# Altium PCB PCB1.PcbDoc
Units mil, origin at the board's own origin, x right, y up, seen from the top; angles counter-clockwise.
Board outline 2920 x 3687.01 mil, 2 copper layers (Top Layer, Bottom Layer); 98 components, 58 nets, 246 pads, 94 vias.
Unrouted connection lines stored in the file: 1.
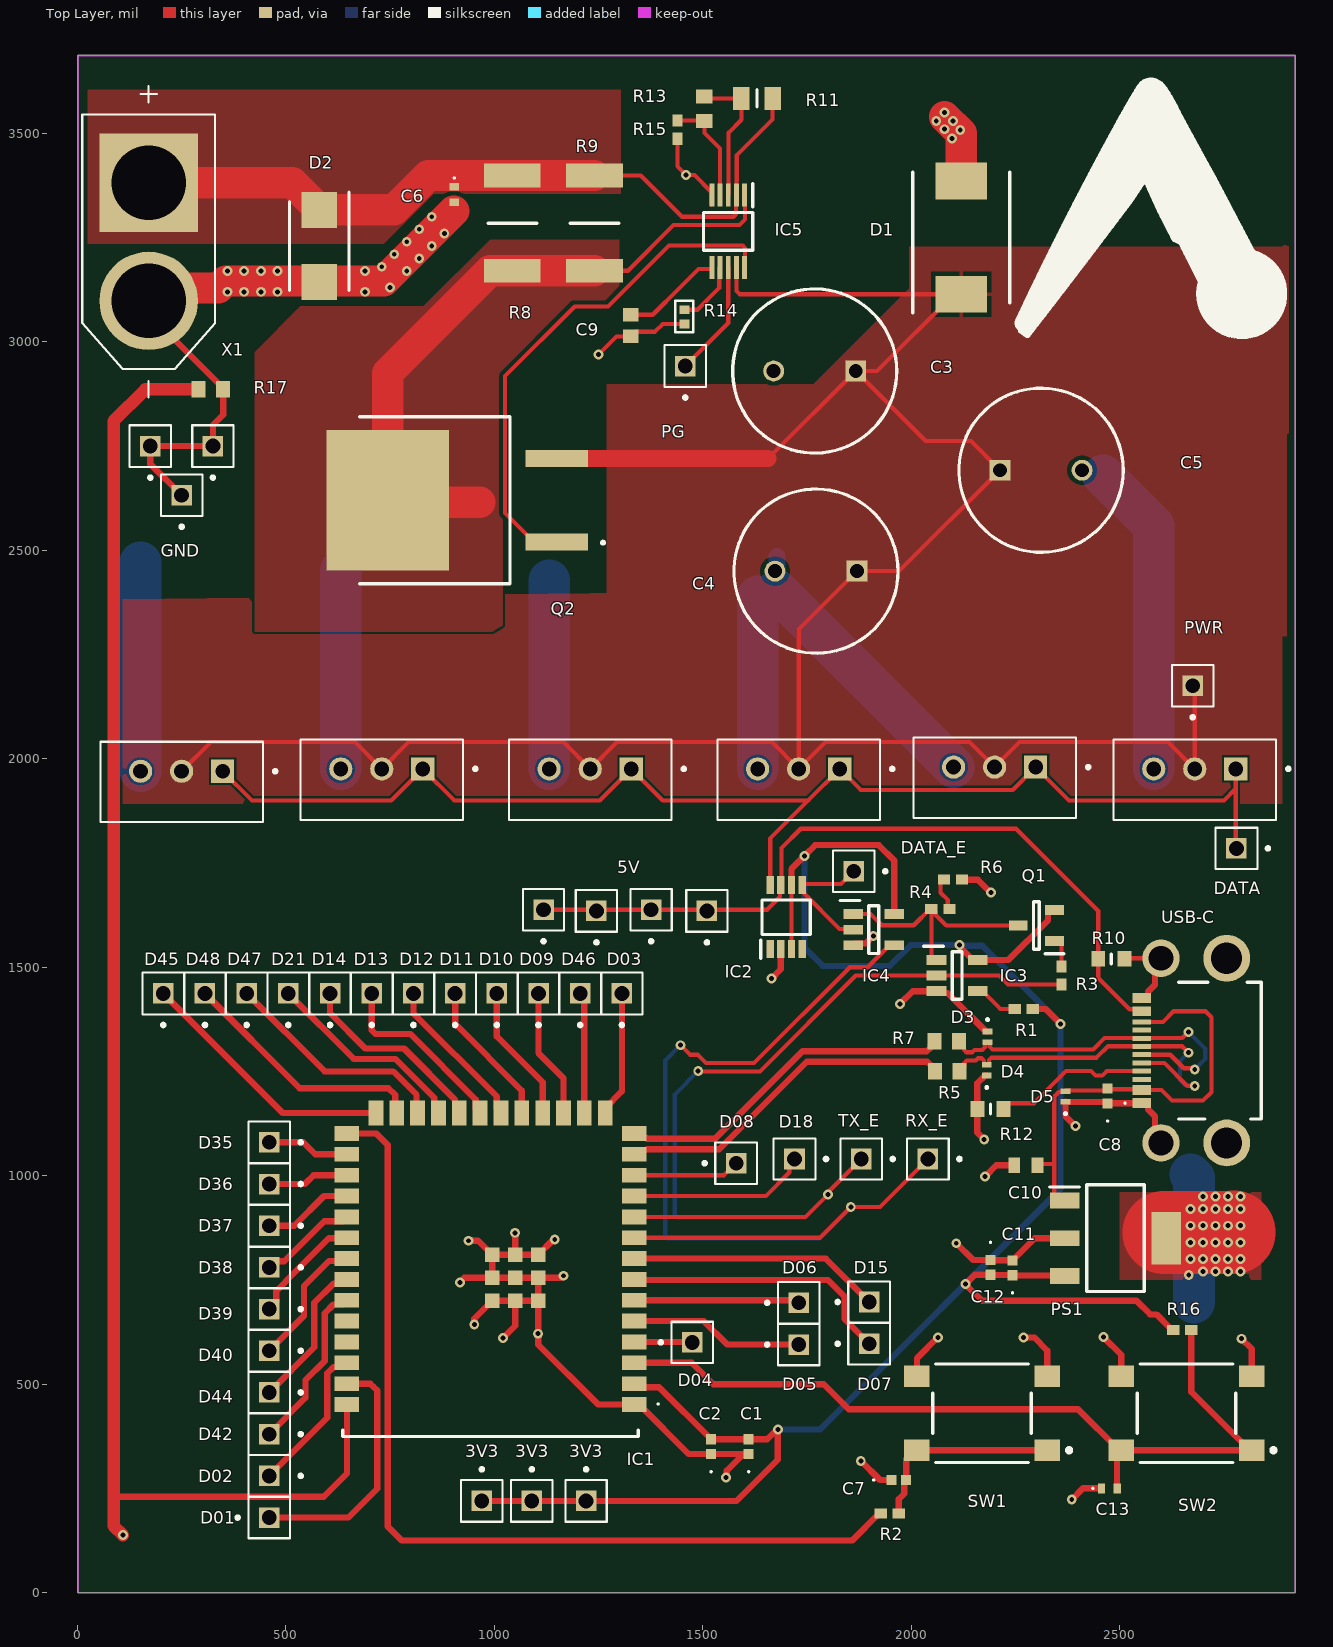
[diagram p0: Top Layer view]
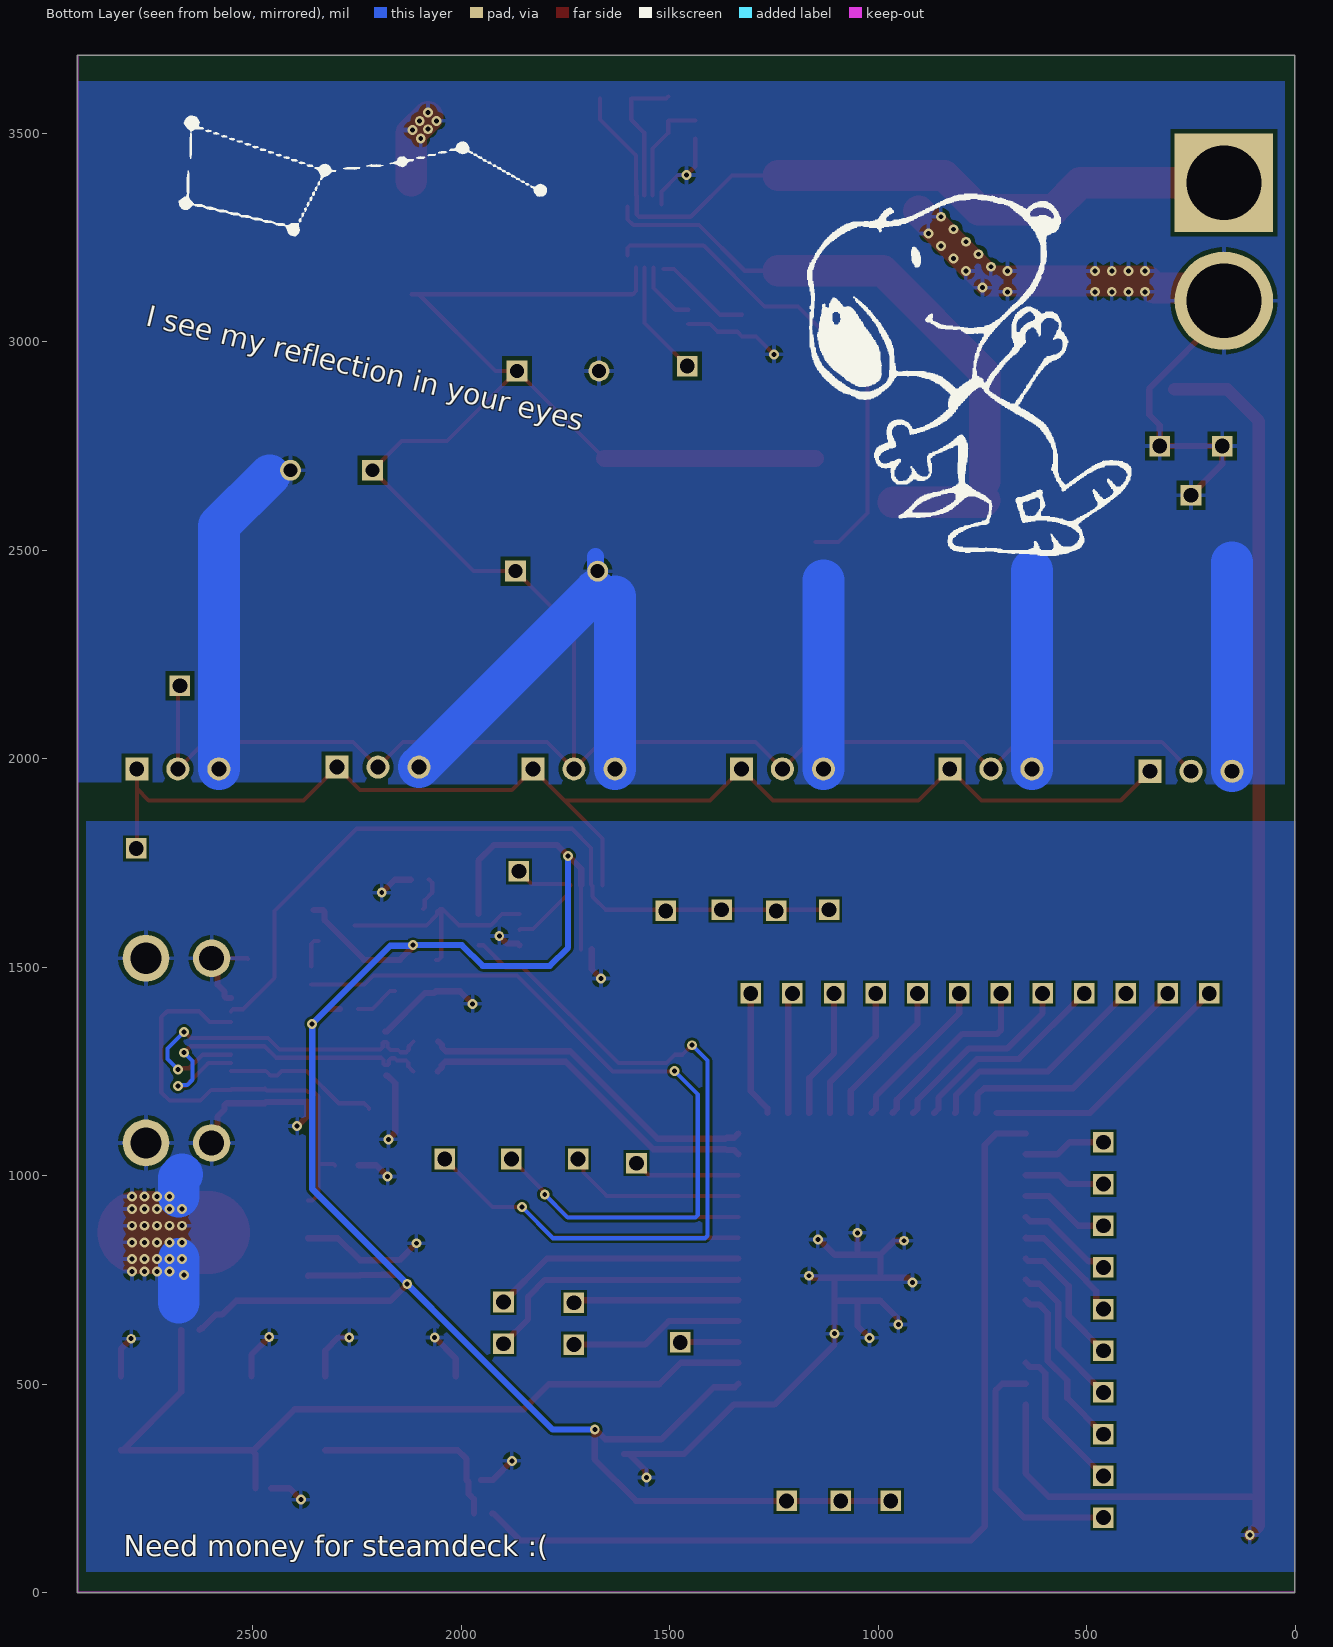
[diagram p1: Bottom Layer view, seen from below]
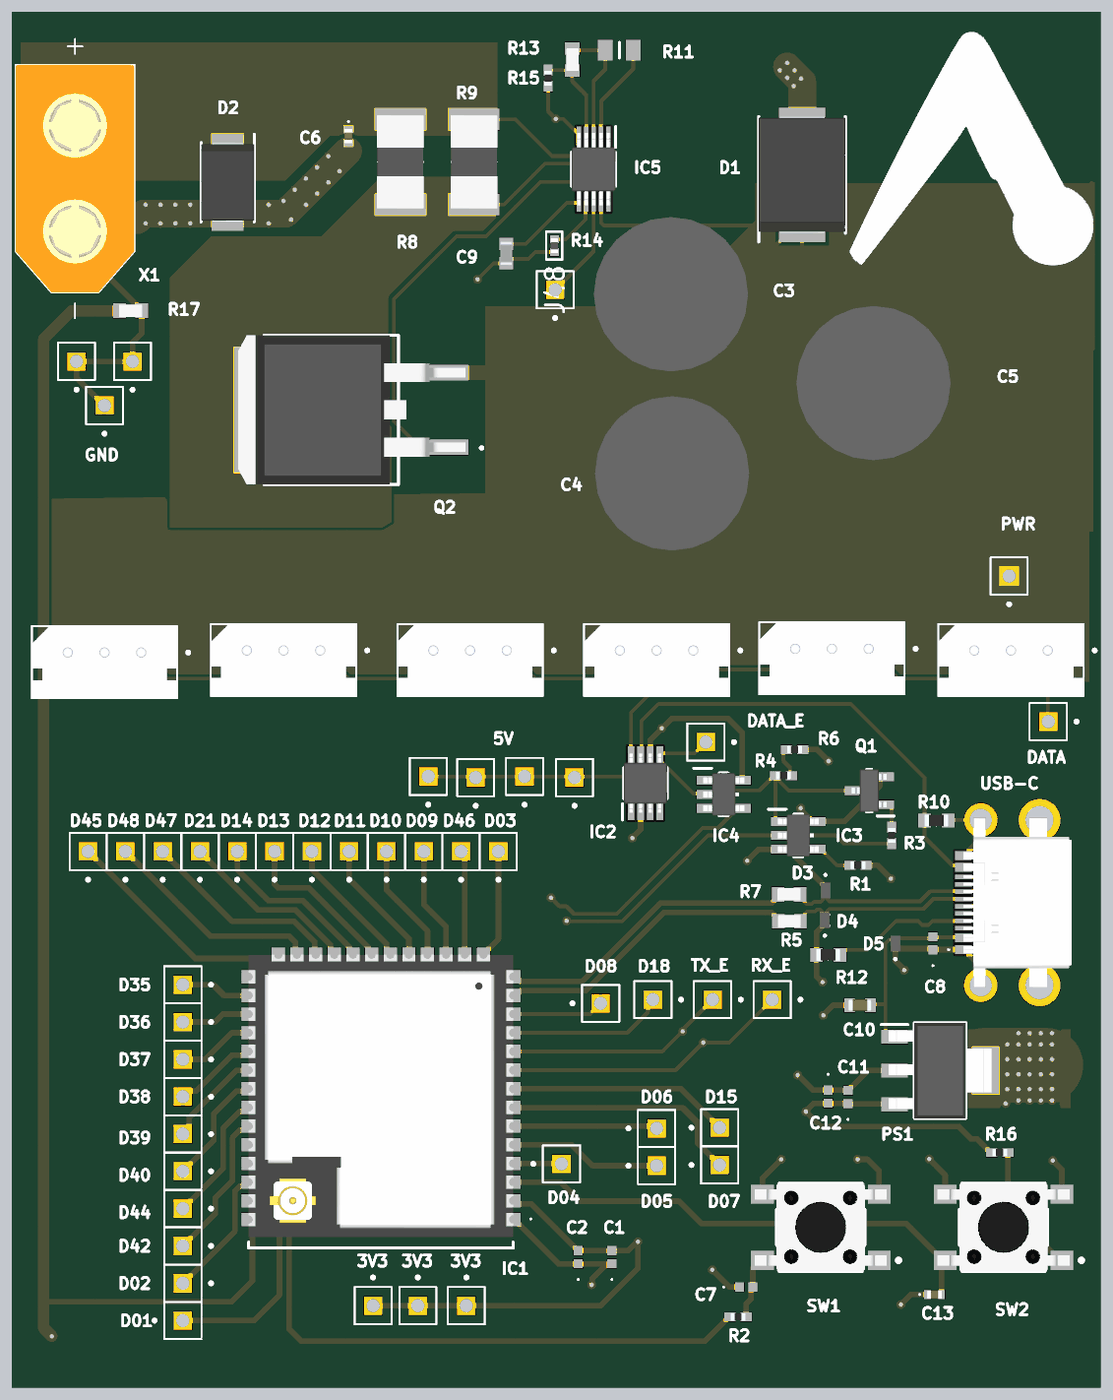
[diagram p2: 3D render of the assembled board from above, using the file's embedded part models]

## Layer stack, top to bottom
Top Solder: solder mask 0.4, Solder Resist, Dk 3.5
Top Layer: signal copper 1.378
Dielectric 1: dielectric 12.6, FR-4, Dk 4.8
Bottom Layer: signal copper 1.378
Bottom Solder: solder mask 0.4, Solder Resist, Dk 3.5

## Board outline
1,0 1,3687.01 2921,3687.01 2921,0

## Design rules (kind name [scope] priority, off if disabled: settings)
Clearance [All] p1: gap=6 ignorepadtopadclearanceinfootprint=FALSE
DiffPairsRouting [All] p1: maxlimit=10 minlimit=10 mostfreqgap=10 toplayer_minwidth=10 toplayer_maxwidth=15 toplayer_prefwidth=15 bottomlayer_minwidth=10 bottomlayer_maxwidth=15 bottomlayer_prefwidth=15 maxuncoupledlength=500
FabricationTestpoint [All] p1: side=3 testpointundercomponent=TRUE minsize=100 maxsize=100 preferedsize=60 minholesize=0 maxholesize=40 preferedholesize=32 testpointgrid=1 allowsidetop=TRUE allowsidebottom=TRUE usegrid=TRUE gridoriginx=0 gridoriginy=-1250 gridtolerance=0.01
MinimumSolderMaskSliver [All] p1: minsoldermaskwidth=4
PolygonConnect PolygonConnect_PWR [InNet('ST_PWR')] p1: thpad.connectstyle=Direct thpad.reliefconductorwidth=10 thpad.reliefentries=4 thpad.polygonreliefangle="90 Angle" thpad.airgapwidth=10 smdpad.connectstyle=Relief smdpad.reliefconductorwidth=10 smdpad.reliefentries=4 smdpad.polygonreliefangle="90 Angle" smdpad.airgapwidth=10 via.connectstyle=Direct via.reliefconductorwidth=10 via.reliefentries=4 via.polygonreliefangle="90 Angle" via.airgapwidth=10
PolygonConnect PolygonConnect_XT60 [InNet('NetC6_1')] p2: connectstyle=Direct reliefconductorwidth=10 reliefentries=4 polygonreliefangle="90 Angle" airgapwidth=10
PolygonConnect PolygonConnect_FET [InNet('NetIC5_1')] p3: connectstyle=Direct reliefconductorwidth=10 reliefentries=4 polygonreliefangle="90 Angle" airgapwidth=10
PolygonConnect ESPGND [InNet('NetIC5_1')] p4: connectstyle=Direct reliefconductorwidth=10 reliefentries=4 polygonreliefangle="90 Angle" airgapwidth=10
PolygonConnect [All] p5: connectstyle=Relief reliefconductorwidth=10 reliefentries=4 polygonreliefangle="90 Angle" airgapwidth=10
RoutingVias [All] p1: holewidth=28 width=50 viastyle="Through Hole" minholewidth=28 minwidth=50 maxholewidth=28 maxwidth=50
SilkToSolderMaskClearance [IsPad] p1: minsilkscreentomaskgap=6 clearancetoexposedcopper=TRUE
SolderMaskExpansion [All] p1: expansion=2 istentingtop=FALSE
SupplyNets "Schematic Supply Nets_3" [InNet('GND_ESP')] p1: voltage=0.000
SupplyNets "Schematic Supply Nets_2" [InNet('+5V')] p2: voltage=0.000
SupplyNets "Schematic Supply Nets_1" [InNet('+3v3')] p3: voltage=0.000
SupplyNets "Schematic Supply Nets" [InNet('GND')] p4: voltage=0.000
Width [All] p1: maxlimit=800 minlimit=10 preferedwidth=10
26 further rules are at their usual default settings.

## Classes and differential pairs
component class Schm: C1 C2 C3 C4 C5 C6 C7 C8 C9 C10 C11 C12 C13 D1 D2 D3 D4 D5 IC1 IC2 IC3 IC4 IC5 PS1 Q1 Q2 R1 R2 R3 R4 R5 R6 R7 R8 R9 R10 R11 R12 R13 R14 R15 R16 R17 SW1 SW2 X1
differential pair CON2_USB_R: +CON2_USB_R_P -CON2_USB_R_N
differential pair CON2_USB: +CON2_USB_P -CON2_USB_N

## Components (designator, comment, footprint, x,y, rotation, side; value= is the part's Value field where it differs from the comment)
3V3 "1pin connector" "1 pin_conn" 970,220 r270 top (schematic designator J19)
3V3 "1pin connector" "1 pin_conn" 1090,220 r270 top (schematic designator J18)
3V3 "1pin connector" "1 pin_conn" 1220,220 r270 top (schematic designator J16)
5V "1pin connector" "1 pin_conn" 1118,1638 r90 top (schematic designator J14)
C1 "100nF, 50V" C0402C104J4RACTU 1610,350 r90 top
C2 "10uF, 10V" C0402C104J4RACTU 1520,350 r90 top
C3 "EEU-FR1E122LB" CAPPRD500W65D1000H2700 1866.85,2930 r180 top
C4 "EEU-FR1E122LB" CAPPRD500W65D1000H2700 1870,2450 r180 top
C5 "EEU-FR1E122LB" CAPPRD500W65D1000H2700 2213,2692 r0 top
C6 "1uF, 35V" GRM15x 904,3353.7 r270 top
C7 "100nF, 50V" C0402C104J4RACTU 1970,270 r0 top
C8 "100nF, 50V" C0402C104J4RACTU 2471,1191 r90 top
C9 "150nF" CAPC1608X90N#1 1327,3039 r270 top
C10 "4u7, 16v" CAPC1608X90N#2 2275,1025 r0 top
C11 "10uF, 10V" C0402C104J4RACTU 2243,779 r90 top
C12 "10uF, 10V" C0402C104J4RACTU 2190,780 r270 top
C13 "1uF, 35V" GRM15x 2475,250 r0 top
D1 "MBRS3100T3G" DIOM8059X261N 2120,3250 r90 top
D01 "1pin connector" "1 pin_conn" 460,180 r0 top (schematic designator J2)
D02 "1pin connector" "1 pin_conn" 460,280 r180 top (schematic designator J3)
D2 "SMBJ15A" DIOM5436X244N 580,3230 r270 top
D03 "1pin connector" "1 pin_conn" 1306,1437 r90 top (schematic designator J4)
D3 "AQ3045-01ETG" AQ304501ETG 2183,1333 r270 top
D04 "1pin connector" "1 pin_conn" 1475,600 r0 top (schematic designator J5)
D4 "AQ3045-01ETG" AQ304501ETG 2181,1253 r90 top
D05 "1pin connector" "1 pin_conn" 1730,595 r0 top (schematic designator J6)
D5 "AQ3045-01ETG" AQ304501ETG 2370,1190 r90 top
D06 "1pin connector" "1 pin_conn" 1730,695 r0 top (schematic designator J7)
D07 "1pin connector" "1 pin_conn" 1899,597 r0 top (schematic designator J8)
D08 "1pin connector" "1 pin_conn" 1580,1030 r0 top (schematic designator J9)
D09 "1pin connector" "1 pin_conn" 1106,1437 r90 top (schematic designator J10)
D10 "1pin connector" "1 pin_conn" 1006,1437 r90 top (schematic designator J11)
D11 "1pin connector" "1 pin_conn" 906,1437 r90 top (schematic designator J12)
D12 "1pin connector" "1 pin_conn" 806,1437 r90 top (schematic designator J13)
D13 "1pin connector" "1 pin_conn" 706,1437 r90 top (schematic designator J21)
D14 "1pin connector" "1 pin_conn" 606,1437 r90 top (schematic designator J22)
D15 "1pin connector" "1 pin_conn" 1899,697 r0 top (schematic designator J23)
D18 "1pin connector" "1 pin_conn" 1720,1040 r180 top (schematic designator J24)
D21 "1pin connector" "1 pin_conn" 506,1437 r90 top (schematic designator J25)
D35 "1pin connector" "1 pin_conn" 460,1080 r180 top (schematic designator J26)
D36 "1pin connector" "1 pin_conn" 460,980 r180 top (schematic designator J27)
D37 "1pin connector" "1 pin_conn" 460,880 r180 top (schematic designator J28)
D38 "1pin connector" "1 pin_conn" 460,780 r180 top (schematic designator J29)
D39 "1pin connector" "1 pin_conn" 460,680 r180 top (schematic designator J30)
D40 "1pin connector" "1 pin_conn" 460,580 r180 top (schematic designator J31)
D42 "1pin connector" "1 pin_conn" 460,380 r180 top (schematic designator J33)
D44 "1pin connector" "1 pin_conn" 460,480 r180 top (schematic designator J32)
D45 "1pin connector" "1 pin_conn" 206,1437 r90 top (schematic designator J34)
D46 "1pin connector" "1 pin_conn" 1206,1437 r90 top (schematic designator J35)
D47 "1pin connector" "1 pin_conn" 406,1437 r90 top (schematic designator J36)
D48 "1pin connector" "1 pin_conn" 306,1437 r90 top (schematic designator J37)
DATA "1pin connector" "1 pin_conn" 2780,1785 r180 top (schematic designator J51)
DATA_E "1pin connector" "1 pin_conn" 1862,1730 r180 top (schematic designator J50)
GND "1pin connector" "1 pin_conn" 250,2632 r90 top (schematic designator J39)
IC1 "ESP32-S3-WROOM-1U-N8R8" ESP32S3WROOM1UN8R8 990.94,782.28 r180 top
IC2 "TXS0102VDCTR" SOP65P400X130-8N 1700,1620 r90 top
IC3 "SN74LVC1G126DBVR" SOT95P280X145-5N 2110,1480 r0 top
IC4 "SN74LVC1G125DBVR" SOT95P280X145-5N 1910,1590 r0 top
IC5 "LM5069MM-2_NOPB" LM5069MM-2/NOPB 1561,3265 r270 top
J1 "1pin connector" "1 pin_conn" 1376,1638 r90 top
J15 "1pin connector" "1 pin_conn" 1245,1635 r90 top
J17 "1pin connector" "1 pin_conn" 1510,1635 r90 top
J38 "1pin connector" "1 pin_conn" 175,2750 r90 top
J40 "1pin connector" "1 pin_conn" 325,2750 r90 top
J41 "5267-03A-X" MOLEX_5267-03A-X 1730,1950 r180 top
J42 "5267-03A-X" MOLEX_5267-03A-X 2200,1954.41 r180 top
J43 "5267-03A-X" MOLEX_5267-03A-X 2680,1950 r180 top
J44 "5267-03A-X" MOLEX_5267-03A-X 250,1944.41 r180 top
J45 "5267-03A-X" MOLEX_5267-03A-X 730,1950 r180 top
J46 "5267-03A-X" MOLEX_5267-03A-X 1230,1950 r180 top
PG "1pin connector" "1 pin_conn" 1458,2942 r90 top (schematic designator J48)
PS1 "TL1963A-33DCYR" TL1963A-33DCYR 2490,850 r0 top
PWR "1pin connector" "1 pin_conn" 2675,2175 r90 top (schematic designator J20)
Q1 "S8550" SOT95P240X110-3N 2300,1600 r180 top
Q2 "CSD19536KTT" CSD19536KTTT 677.56,2620 r0 top
R1 "10K" RESC1005X40N 2270,1400 r0 top
R2 "27R" RESC1005X40N 1948.35,190 r180 top
R3 "10K" RESC1005X40N 2360,1480 r90 top
R4 "10K" RESC1005X40N 2070,1640 r180 top
R5 "OR" RESC1608X50N 2086,1250 r180 top
R6 "10K" RESC1005X40N 2100,1710 r180 top
R7 "OR" RESC1608X50N 2085,1322 r180 top
R8 "WSLP25122L500FEA" RESC6432X89N 1043.4,3284.57 r90 top
R9 "WSLP25122L500FEA" RESC6432X89N 1240.25,3284.57 r90 top
R10 "5K1" RESC1608X60N 2480,1520 r180 top
R11 "43.2K" RESC2012X60N 1630,3584 r0 top
R12 "5K1" RESC1608X60N 2190,1160 r180 top
R13 "CRCW06035K49FKEA" RESC1608X50N 1504,3559 r90 top
R14 "8.2K" RESC1005X37N 1456,3060 r90 top value=10kΩ
R15 "RMCF0402FT9K76" RESC1005X40N 1439,3509 r90 top
R16 "10K" RESC1005X40N 2650,630 r180 top
R17 "OR" RESC1608X50N 320,2886 r0 top
RX_E "1pin connector" "1 pin_conn" 2040,1040 r180 top (schematic designator J49)
SW1 "PTS645SH50SMTR92LFS" "FP-PTS645SH50SMTR92LFS-MFG - duplicate" 2170,430 r180 top
SW2 "PTS645SH50SMTR92LFS" "FP-PTS645SH50SMTR92LFS-MFG - duplicate" 2660,430 r180 top
TX_E "1pin connector" "1 pin_conn" 1880,1040 r180 top (schematic designator J52)
USB-C "UJ20-C-H-G-MSMT-4B-P16-TR" UJ20CHGMSMT4BP16TR 2696,1300 r90 top (schematic designator J47)
X1 "XT60" AMASS_XT60-M 171,3240 r270 top

## Footprints (in the part's own frame and the unit in brackets; to place one, negate y for a bottom-side part, rotate by r counter-clockwise, add the part's x,y. Pads: shape width x height; smd on the part's side, far side on the other; paste and mask are expansions set on the pad)
"1 pin_conn" [mm]
  rect 1.25x1.25 hole 0.9: 1(0,0)
  silkscreen extent -2.02,-1.26 1.27,1.26
AMASS_XT60-M [mm]
  round 6 hole 4.55: N(3.6,0)
  rect 6x6 / inner round 6 / far side rect 6x6 hole 4.55: P(-3.6,0)
  silkscreen extent -9.5,-4.05 9.5,4.05, body extent -7.75,-4.05 7.75,4.05, height 16
AQ304501ETG [mm]
  rect 0.35x0.6 smd: 1(-0.325,0) 2(0.325,0)
  silkscreen extent -1.1,-0.05 -1,0.05, body extent -0.54,-0.34 0.54,0.34, height 0.43
C0402C104J4RACTU [mm]
  rect 0.62x0.62 smd: 1(-0.45,0) 2(0.45,0)
  silkscreen extent -1.57,-0.05 -1.47,0.05, body extent -0.52,-0.28 -0.52,-0.28
CAPC1608X90N#1 [mm]
  rect 0.83x0.94 smd: 1(-0.66,0) 2(0.66,0)
  body extent -0.81,-0.4 0.79,0.4, height 0.78
CAPC1608X90N#2 [mm]
  rect 0.73x0.94 smd: 1(-0.71,0) 2(0.71,0)
  body extent -0.8,-0.4 0.8,0.4, height 0.9
CAPPRD500W65D1000H2700 [mm]
  rect 1.275x1.275 hole 0.85: 1(0,0)
  round 1.275 hole 0.85: 2(5,0)
  silkscreen extent -2.5,-5 7.5,5, body extent -2.75,-5.25 7.75,5.25, height 27
CSD19536KTTT [mm]
  rect 3.82x1.05 smd: 1(12,-2.54) 3(12,2.54)
  rect 7.48x8.55 smd: 2(1.7,0)
  silkscreen extent 0,-5.08 14.9,5.08, body extent -1.78,-5.07 13.72,5.07, height 4.7
DIOM5436X244N [mm]
  rect 2.2x2.15 smd: 1(-2.2,0) 2(2.2,0)
  silkscreen extent -3.27,-1.81 2.7,1.81, body extent -2.7,-1.81 2.7,1.81, height 2.44
DIOM8059X261N [mm]
  rect 2.25x3.15 smd: 1(-3.45,0) 2(3.45,0)
  silkscreen extent -4.57,-2.95 3.98,2.95, body extent -3.98,-2.95 3.98,2.95, height 2.61
ESP32S3WROOM1UN8R8 [mm]
  rect 1.5x0.9 smd: 1(-8.75,8.41) 2(-8.75,7.14) 3(-8.75,5.87) 4(-8.75,4.6) 5(-8.75,3.33) 6(-8.75,2.06) 7(-8.75,0.79) 8(-8.75,-0.48) 9(-8.75,-1.75) 10(-8.75,-3.02) 11(-8.75,-4.29) 12(-8.75,-5.56) 13(-8.75,-6.83) 14(-8.75,-8.1) 27(8.75,-8.1) 28(8.75,-6.83) 29(8.75,-5.56) 30(8.75,-4.29) 31(8.75,-3.02) 32(8.75,-1.75) 33(8.75,-0.48) 34(8.75,0.79) 35(8.75,2.06) 36(8.75,3.33) 37(8.75,4.6) 38(8.75,5.87) 39(8.75,7.14) 40(8.75,8.41)
  rect 0.9x1.5 smd: 15(-6.985,-9.35) 16(-5.715,-9.35) 17(-4.445,-9.35) 18(-3.175,-9.35) 19(-1.905,-9.35) 20(-0.635,-9.35) 21(0.635,-9.35) 22(1.905,-9.35) 23(3.175,-9.35) 24(4.445,-9.35) 25(5.715,-9.35) 26(6.985,-9.35)
  rect 0.9x0.9 smd: 41(-1.5,0.69) 42(-2.9,2.09) 43(-2.9,0.69) 44(-2.9,-0.71) 45(-1.5,-0.71) 46(-0.1,-0.71) 47(-0.1,0.69) 48(-0.1,2.09) 49(-1.5,2.09)
  silkscreen extent -10.26,8.33 9,10.36, body extent -9.01,-9.61 9.01,9.6, height 3.25
"FP-PTS645SH50SMTR92LFS-MFG - duplicate" [mm]
  rect 1.55x1.3 smd paste+0 mask+0: 1(-3.975,2.25) 2(3.975,2.25) 3(-3.975,-2.25) 4(3.975,-2.25)
  silkscreen extent -5.43,-3 3,3, body extent -4.5,-3 4.5,3, height 4.3
GRM15x [mm]
  rect 0.45x0.6 smd: 1(-0.475,0) 2(0.475,0)
  silkscreen extent -1.05,-0.05 -0.95,0.05, body extent -0.5,-0.28 0.5,0.27, height 0.5
LM5069MM-2/NOPB [mm]
  rect 1.4x0.3 smd mask+0.152: 1(-2.2,1) 2(-2.2,0.5) 3(-2.2,0) 4(-2.2,-0.5) 5(-2.2,-1) 6(2.2,-1) 7(2.2,-0.5) 8(2.2,0) 9(2.2,0.5) 10(2.2,1)
  silkscreen extent -2.9,-1.5 1.15,1.5, body extent -2.46,-1.5 2.46,1.5, height 1.1
MOLEX_5267-03A-X [mm]
  rect 1.408x1.408 / inner round 1.408 / far side rect 1.408x1.408 hole 0.9: 1(-2.5,-0.65)
  round 1.408 hole 0.9: 2(0,-0.65) 3(2.5,-0.65)
  silkscreen extent -5.8,-2.45 4.95,2.45, body extent -4.95,-2.45 4.95,2.45, height 5.81
RESC1005X37N [mm]
  rect 0.54x0.6 smd: 1(-0.432,0) 2(0.432,0)
  silkscreen extent -0.94,-0.53 0.97,0.56, body extent -0.5,-0.25 0.5,0.25, height 0.37
RESC1005X40N [mm]
  rect 0.75x0.6 smd: 1(-0.55,0) 2(0.55,0)
  body extent -0.5,-0.25 0.5,0.25, height 0.4
RESC1608X50N [mm]
  rect 0.85x1 smd: 1(-0.75,0) 2(0.75,0)
  body extent -0.77,-0.43 0.78,0.42, height 0.45
RESC1608X60N [mm]
  rect 0.85x0.95 smd: 1(-0.8,0) 2(0.8,0)
  silkscreen extent 0,-0.3 0,0.3, body extent -0.8,-0.4 0.8,0.4, height 0.6
RESC2012X60N [mm]
  rect 1x1.4 smd: 1(-0.95,0) 2(0.95,0)
  silkscreen extent 0,-0.53 0,0.53, body extent 0,0 0,0
RESC6432X89N [mm]
  rect 1.45x3.45 smd: 1(-2.9,0) 2(2.9,0)
  silkscreen extent 0,-1.49 0,1.49, body extent -3.17,-1.59 3.17,1.59, height 0.64
SOP65P400X130-8N [mm]
  rect 1.1x0.45 smd mask+0.152: 1(-1.95,0.975) 2(-1.95,0.325) 3(-1.95,-0.325) 4(-1.95,-0.975) 5(1.95,-0.975) 6(1.95,-0.325) 7(1.95,0.325) 8(1.95,0.975)
  silkscreen extent -2.5,-1.48 1.05,1.55, body extent -2.01,-1.48 2.01,1.48, height 0.91
SOT95P240X110-3N [mm]
  rect 1.15x0.6 smd: 1(-1.1,0.95) 2(-1.1,-0.95) 3(1.1,0)
  silkscreen extent -1.68,-1.45 0.18,1.73, body extent -1.2,-1.45 1.2,1.45, height 1.1
SOT95P280X145-5N [mm]
  rect 1.2x0.6 smd: 1(-1.25,0.95) 2(-1.25,0) 3(-1.25,-0.95) 4(1.25,-0.95) 5(1.25,0.95)
  silkscreen extent -2.03,-1.45 0.3,1.78, body extent -1.4,-1.45 1.4,1.45, height 1.2
TL1963A-33DCYR [mm]
  rect 1.8x0.95 smd: 1(-3.1,2.3) 2(-3.1,0) 3(-3.1,-2.3)
  rect 1.8x3.2 smd: 4(3.1,0)
  silkscreen extent -4,-3.25 1.75,3.25, body extent -3.5,-3.25 3.5,3.25, height 1.68
UJ20CHGMSMT4BP16TR [mm]
  rect 0.6x1.15 smd mask+0.152: A1(-3.2,3.638) A4(-2.4,3.638) B1(3.2,3.638) B4(2.4,3.638)
  rect 0.3x1.15 smd mask+0.152: A5(-1.25,3.638) A6(-0.25,3.638) A7(0.25,3.638) A8(1.25,3.638) B5(1.75,3.638) B6(0.75,3.638) B7(-0.75,3.638) B8(-1.75,3.638)
  round 2.28 hole 1.52: MH1(-5.625,2.463) MH2(5.625,2.463)
  round 2.85 hole 1.9: MH3(-5.625,-1.537) MH4(5.625,-1.537)
  silkscreen extent -4.17,-3.64 4.17,4.7, body extent -5.78,-3.55 5.77,3.66, height 2.25

## Part data
3V3 3V3 3V3 5V D01 D02 D03 D04 D05 D06 D07 D08 D09 D10 D11 D12 D13 D14 D15 D18 D21 D35 D36 D37 D38 D39 D40 D42 D44 D45 D46 D47 D48 DATA DATA_E GND J1 J15 J17 J38 J40 PG PWR RX_E TX_E: "Board Connector, 1 Contact(s), 1 Row(s), Female, Straight, Solder Terminal, Black Insulator, Receptacle"
C1 C7 C8: library part E0402X7R104K500NTB, "100 nF 10% 50V Ceramic Capacitor X7R 0402 (1005 Metric)", Manufacturer_Name="Yageo Group", Manufacturer_Part_Number=C0402C101G3GALTU, Datasheet Link=https://content.kemet.com/datasheets/KEM_C1002_X7R_SMD.pdf, Height=0.55mm
C2 C11 C12: library part CL21A106KPFNNNF, "Cap Ceramic 10uF 10V X5R 10% SMD 0805 85C Embossed T/R", Manufacturer_Name="Yageo Group", Manufacturer_Part_Number=C0402C101G3GALTU, Datasheet Link=https://content.kemet.com/datasheets/KEM_C1002_X7R_SMD.pdf, Height=0.55mm
C3 C4 C5: "Capacitor Polarised", Manufacturer_Name=Panasonic, Mouser Part Number=667-EEU-FR1E122LB, Datasheet Link=http://industrial.panasonic.com/cdbs/www-data/pdf/RDF0000/ABA0000C1259.pdf, Height=27mm, Manufacturer_Part_Number=EEU-FR1E122LB, Mouser Price/Stock=https://www.mouser.com/Search/Refine.aspx?Keyword=667-EEU-FR1E122LB
C6 C13: library part GRM155R6YA105ME11D, "Capacitor", Manufacturer_Name="Murata Electronics", Mouser Part Number=81-GRM155R6YA105ME1D, Arrow Part Number=GRM155R6YA105ME11D, Arrow Price/Stock=https://www.arrow.com/en/products/grm155r6ya105me11d/murata-manufacturing, Datasheet Link=https://search.murata.co.jp/Ceramy/image/img/A01X/G101/ENG/GRM155R6YA105ME11-01A.pdf, Height=0.33mm, Manufacturer_Part_Number=GRM155R6YA105ME11D, Mouser Price/Stock=https://www.mouser.com/Search/Refine.aspx?Keyword=81-GRM155R6YA105ME1D
C9: library part 06033D224MAT2A, "Multilayer Ceramic Capacitors MLCC - SMD/SMT KGM15BR51E224MT NEW GLOBAL PN 25V .22uF A 581-", Manufacturer_Name="Kyocera AVX", Mouser Part Number=581-06033D224MAT2A, Datasheet Link=https://componentsearchengine.com/Datasheets/1/06031A100FAT2A.pdf, Height=0.9mm, Manufacturer_Part_Number=06033D224MAT2A, Mouser Price/Stock=https://www.mouser.co.uk/ProductDetail/KYOCERA-AVX/06033D224MAT2A?qs=VsusWq3clnxkz0k6zqAqqQ%3D%3D
C10: library part grm188z71c475ke21d, "Capacitor", Arrow Part Number=CL10A475KO8NNNC, Manufacturer_Name=SAMSUNG, Mouser Part Number=187-CL10A475KO8NNNC, Arrow Price/Stock=https://www.arrow.com/en/products/cl10a475ko8nnnc/samsung-electro-mechanics.html?utm_currency=USD&region=nac, Datasheet Link=https://rs.componentsearchengine.com/Datasheets/2/CL10A475KO8NNNC.pdf, Height=0.9mm, Manufacturer_Part_Number=CL10A475KO8NNNC, Mouser Price/Stock=https://www.mouser.co.uk/ProductDetail/Samsung-Electro-Mechanics/CL10A475KO8NNNC?qs=X6jEic%2FHinAbIjmLnFfqqQ%3D%3D
D1: "Diode", Manufacturer_Name=onsemi, Mouser Part Number=863-MBRS3100T3G, Arrow Part Number=MBRS3100T3G, Arrow Price/Stock=https://www.arrow.com/en/products/mbrs3100t3g/on-semiconductor?utm_currency=USD&region=nac, Datasheet Link=https://www.onsemi.com/pub/Collateral/MBRS3100T3-D.PDF, Height=2.61mm, Manufacturer_Part_Number=MBRS3100T3G, Mouser Price/Stock=https://www.mouser.co.uk/ProductDetail/onsemi/MBRS3100T3G?qs=3JMERSakebrbkNtjl3tdRw%3D%3D
D2: "TVS Diode (Uni-directional)", Manufacturer_Name=Vishay, Mouser Part Number=78-SMBJ15A, Datasheet Link=http://www.vishay.com/docs/88392/smbj.pdf, Height=2.44mm, Manufacturer_Part_Number=SMBJ15A, Mouser Price/Stock=https://www.mouser.co.uk/ProductDetail/Vishay-General-Semiconductor/SMBJ15A?qs=%252BA9HMDDz5KavBY56EO7ceQ%3D%3D
D3 D4 D5: "TVS Diode (Bi-directional)", Manufacturer_Name=LITTELFUSE, Mouser Part Number=576-AQ3045-01ETG, Arrow Part Number=AQ3045-01ETG, Arrow Price/Stock=https://www.arrow.com/en/products/aq3045-01etg/littelfuse.html?utm_currency=USD&region=nac, Datasheet Link=http://m.littelfuse.com/~/media/electronics/datasheets/tvs_diode_arrays/littelfuse_tvs_diode_array_aq3045_datasheet.pdf.pdf, Height=0.42mm, Manufacturer_Part_Number=AQ3045-01ETG, Mouser Price/Stock=https://www.mouser.co.uk/ProductDetail/Littelfuse/AQ3045-01ETG?qs=lM4gFlnEeEMEfe%252B5jSw4OA%3D%3D
IC1: "Integrated Circuit", Manufacturer_Name="Espressif Systems", Mouser Part Number=356-ESP32S3WRM1UN8R8, Datasheet Link=https://www.espressif.com/sites/default/files/documentation/esp32-s3-wroom-1_wroom-1u_datasheet_en.pdf, Height=3.35mm, Manufacturer_Part_Number=ESP32-S3-WROOM-1U-N8R8, Mouser Price/Stock=https://www.mouser.co.uk/ProductDetail/Espressif-Systems/ESP32-S3-WROOM-1U-N8R8?qs=Li%252BoUPsLEnvOglIa3CypaQ%3D%3D
IC2: "Integrated Circuit", Manufacturer_Name="Texas Instruments", Mouser Part Number=595-TXS0102VDCTR, Arrow Part Number=TXS0102VDCTR, Arrow Price/Stock=https://www.arrow.com/en/products/txs0102vdctr/texas-instruments?utm_currency=USD&region=nac, Datasheet Link=https://www.ti.com/lit/ds/symlink/txs0102v.pdf?ts=1736527127556&ref_url=https%253A%252F%252Fwww.ti.com%252Flogic-voltage-translation%252Fvoltage-translators-level-shifters%252Fproducts.html, Height=1.3mm, Manufacturer_Part_Number=TXS0102VDCTR, Mouser Price/Stock=https://www.mouser.co.uk/ProductDetail/Texas-Instruments/TXS0102VDCTR?qs=olJun0bQHM%2FUS3bAIjbB0A%3D%3D
IC3: "Integrated Circuit", Manufacturer_Name="Texas Instruments", Mouser Part Number=595-SN74LVC1G126DBVR, Arrow Part Number=SN74LVC1G126DBVR, Arrow Price/Stock=https://www.arrow.com/en/products/sn74lvc1g126dbvr/texas-instruments.html?utm_currency=USD&region=nac, Datasheet Link=http://www.ti.com/lit/ds/symlink/sn74lvc1g126.pdf, Height=1.45mm, Manufacturer_Part_Number=SN74LVC1G126DBVR, Mouser Price/Stock=https://www.mouser.co.uk/ProductDetail/Texas-Instruments/SN74LVC1G126DBVR?qs=pajgIaoyDUi3T2WgNNfd3w%3D%3D
IC4: "Integrated Circuit", Manufacturer_Name="Texas Instruments", Mouser Part Number=595-SN74LVC1G125DBVR, Arrow Part Number=SN74LVC1G125DBVR, Arrow Price/Stock=https://www.arrow.com/en/products/sn74lvc1g125dbvr/texas-instruments.html?utm_currency=USD&region=asia, Datasheet Link=http://www.ti.com/lit/ds/symlink/sn74lvc1g125.pdf, Height=1.45mm, Manufacturer_Part_Number=SN74LVC1G125DBVR, Mouser Price/Stock=https://www.mouser.co.uk/ProductDetail/Texas-Instruments/SN74LVC1G125DBVR?qs=dT9u2OTAaVWCjkJK89JQQg%3D%3D
IC5: "Integrated Circuit", Arrow Part Number=LM5069MM-2/NOPB, Manufacturer_Name="Texas Instruments", Mouser Part Number=926-LM5069MM-2/NOPB, Arrow Price/Stock=https://www.arrow.com/en/products/lm5069mm-2nopb/texas-instruments.html?utm_currency=USD&region=nac, Datasheet Link=http://www.ti.com/lit/gpn/lm5069, Height=1.1mm, Manufacturer_Part_Number=LM5069MM-2/NOPB, Mouser Price/Stock=https://www.mouser.co.uk/ProductDetail/Texas-Instruments/LM5069MM-2-NOPB?qs=QbsRYf82W3EdgSJlau%252Bfzw%3D%3D
J41 J42 J43 J44 J45 J46: "CONN HEADER TH 3POS 2.5mm", Package=None, Check_prices=https://www.snapeda.com/parts/5267-03A-X/Molex/view-part/?ref=eda, MF=Molex, MP=5267-03A-X, SnapEDA_Link=https://www.snapeda.com/parts/5267-03A-X/Molex/view-part/?ref=snap
PS1: "Power Supply", Manufacturer_Name="Texas Instruments", Mouser Part Number=595-TL1963A-33DCYR, Arrow Part Number=TL1963A-33DCYR, Arrow Price/Stock=https://www.arrow.com/en/products/tl1963a-33dcyr/texas-instruments?utm_currency=USD&region=nac, Datasheet Link=http://www.ti.com/lit/gpn/tl1963a, Height=1.8mm, Manufacturer_Part_Number=TL1963A-33DCYR, Mouser Price/Stock=https://www.mouser.co.uk/ProductDetail/Texas-Instruments/TL1963A-33DCYR?qs=IK5e5L0zOXhRu%2FNTAfJNEA%3D%3D
Q1: "Transistor BJT PNP", Manufacturer_Name=Galaxy, Datasheet Link=https://datasheet.datasheetarchive.com/originals/distributors/Datasheets-3/DSA-49109.pdf, Height=1.1mm, Manufacturer_Part_Number=S8550
Q2: "MOSFET (N-Channel)", Manufacturer_Name="Texas Instruments", Mouser Part Number=595-CSD19536KTT, Arrow Part Number=CSD19536KTT, Arrow Price/Stock=https://www.arrow.com/en/products/csd19536ktt/texas-instruments.html?utm_currency=USD&region=nac, Datasheet Link=http://www.ti.com/lit/gpn/csd19536ktt, Manufacturer_Part_Number=CSD19536KTT, Mouser Price/Stock=https://www.mouser.co.uk/ProductDetail/Texas-Instruments/CSD19536KTT?qs=MiqG6Kq1qKP2NIsb3jZrDg%3D%3D
R1 R3 R4 R6 R16: library part MC00625W0402110K, "Res General Purpose Thick Film 0402 10k Ohm 1% 1/16W 100ppm/C Molded", Manufacturer_Name="Multicomp Pro", Datasheet Link=http://www.farnell.com/datasheets/2140393.pdf?_ga=1.247542791.1411154270.1472651675, Height=0.4mm, Manufacturer_Part_Number=MC00625W0402110K
R2: library part RMCF0402FT27R0, "RMCF0402FT27R0", Arrow Part Number=RC0402FR-0727RL, Manufacturer_Name="Yageo Group", Mouser Part Number=603-RC0402FR-0727RL, Arrow Price/Stock=https://www.arrow.com/en/products/rc0402fr-0727rl/yageo.html?utm_currency=USD&region=nac, Datasheet Link=https://www.yageogroup.com/content/datasheet/asset/file/PYU-RC_GROUP_51_ROHS_L, Height=0.4mm, Manufacturer_Part_Number=RC0402FR-0727RL, Mouser Price/Stock=https://www.mouser.co.uk/ProductDetail/YAGEO/RC0402FR-0727RL?qs=UOUeRUa%252B8Wlb37UyFHw9Bw%3D%3D
R5 R7 R17: library part CRCW06030000Z0EC, "Resistor", Manufacturer_Name=Vishay, Mouser Part Number=71-CRCW06030000Z0EC, Arrow Part Number=CRCW06030000Z0EC, Arrow Price/Stock=https://www.arrow.com/en/products/crcw06030000z0ec/vishay?utm_currency=USD&region=nac, Datasheet Link=http://www.vishay.com/docs/20035/dcrcwe3.pdf, Height=0.5mm, Manufacturer_Part_Number=CRCW06030000Z0EC, Mouser Price/Stock=https://www.mouser.co.uk/ProductDetail/Vishay-Dale/CRCW06030000Z0EC?qs=5Vo7YKalRVV5nT3RQodYAA%3D%3D
R8 R9: "Fixed Resistor, Metal Strip, 3W, 0.0025ohm, 0.0866V, 1% +/-Tol, 275ppm/Cel, Surface Mount, 2512", Manufacturer_Name=Vishay, Mouser Part Number=71-WSLP25122L500FEA, Arrow Part Number=WSLP25122L500FEA, Arrow Price/Stock=https://www.arrow.com/en/products/wslp25122l500fea/vishay?utm_currency=USD&region=nac, Datasheet Link=https://componentsearchengine.com/Datasheets/1/WSLP25122L500FEA.pdf, Height=0.889mm, Manufacturer_Part_Number=WSLP25122L500FEA, Mouser Price/Stock=https://www.mouser.co.uk/ProductDetail/Vishay-Dale/WSLP25122L500FEA?qs=%2FCXICPRLKg%252BpcyljWM%2FHhA%3D%3D
R10 R12: library part MCWR06X5101FTL, "Res Thick Film 0603 5.1K Ohm 1% 0.1W(1/10W) 100ppm/C Pad SMD T/R", Manufacturer_Name="Multicomp Pro", Datasheet Link=https://4donline.ihs.com/images/VipMasterIC/IC/SCMP/SCMP-S-A0009547702/SCMP-S-A0009547702-1.pdf?hkey=6D3A4C79FDBF58556ACFDE234799DDF0, Height=0.6mm, Manufacturer_Part_Number=MCWR06X5101FTL
R11: library part CR0805-FX-4322ELF, "Res Thick Film 0805 43.2K Ohm 1% 1/8W 100ppm/C Molded SMD SMD Paper Tape on Plastic Reel", Manufacturer_Name=Bourns, Mouser Part Number=652-CR0805FX-4322ELF, Datasheet Link=https://www.bourns.com/pdfs/chpreztr.pdf, Height=0.6mm, Manufacturer_Part_Number=CR0805-FX-4322ELF, Mouser Price/Stock=https://www.mouser.co.uk/ProductDetail/Bourns/CR0805-FX-4322ELF?qs=TYKCbaKwe1AoFj9Z1kLM%2Fw%3D%3D
R13: "Res Thick Film 0603 5.49K Ohm 1% 0.1W(1/10W) 100ppm/C Pad SMD T/R Automotive AEC-Q200", Manufacturer_Name=Vishay, Mouser Part Number=71-CRCW0603-5.49K-E3, Datasheet Link=http://www.vishay.com/docs/20035/dcrcwe3.pdf, Height=0.5mm, Manufacturer_Part_Number=CRCW06035K49FKEA, Mouser Price/Stock=https://www.mouser.co.uk/ProductDetail/Vishay-Dale/CRCW06035K49FKEA?qs=C0yavoHm3BmrHuoVQmHL9Q%3D%3D
R14: library part AC0402FRE0710KL, "Thin Film Resistors - SMD MCT 0603-50 1% P5 10K2", Case/Package=0402, LCSC Part Number=C7209924, Manufacturer="Yageo Group", Max Operating Temperature=155°C, Min Operating Temperature=-55°C, Power Dissipation=62.5mW, Supplier Part Number=13-AC0402FRE0710KLCT-ND, Temperature Coefficient=50ppm/°C, Tolerance=1%, Working Voltage=50V, Category="Chip SMD Resistors", China RoHS=Non-Compliant, ComponentLink1Description=https://datasheet.octopart.com:443/AC0402FRE0710KL-Yageo-datasheet-182189378.pdf?src-supplier=IHS, ComponentLink1URL=https://datasheet.octopart.com:443/AC0402FRE0710KL-Yageo-datasheet-182189378.pdf?src-supplier=IHS, ComponentLink2Description=https://datasheet.octopart.com/AC0402FRE0710KL-Yageo-datasheet-12512238.pdf, ComponentLink2URL=https://datasheet.octopart.com/AC0402FRE0710KL-Yageo-datasheet-12512238.pdf, ComponentLink3Description=http://sigma.octopart.com:80/rohs_statement/Yageo-company-2.pdf?src-supplier=Compliance+Statements, ComponentLink3URL=http://sigma.octopart.com:80/rohs_statement/Yageo-company-2.pdf?src-supplier=Compliance+Statements, ComponentLink4Description=http://sigma.octopart.com:80/conflict_mineral_statement/Yageo-company-3.pdf?src-supplier=Compliance+Statements, ComponentLink4URL=http://sigma.octopart.com:80/conflict_mineral_statement/Yageo-company-3.pdf?src-supplier=Compliance+Statements, Height=320µm, Lifecycle Status=Production, Manufacturer Part Number=AC0402FRE0710KL, Mounting Technology="Surface Mount", Number of Terminals=2, Packaging="Tape & Reel", Pricing="1=0.1, 10=0.037, 25=0.0276, 50=0.0226, 100=0.0186, 250=0.01476, 500=0.01256, 1000=0.01081, 5000=0.00806 (USD)", REACH SVHC=Yes, RoHS=Compliant, Stock=4000, Supplier=DigiKey, Width=500µm
R15: "Res Thick Film 0402 9.76K Ohm 1% 0.063W 100ppm/C Molded SMD Paper T/R", Manufacturer_Name="Stackpole Electronics", Datasheet Link=https://cs.seielect.com/catalog/SEI-RMCF_RMCP.pdf, Height=0.4mm, Manufacturer_Part_Number=RMCF0402FT9K76
SW1 SW2: "SWITCH TACTILE SPST-NO 0.05A 12V", Case/Package=SMD/SMT, Color=Black, Contact Current Rating=50mA, Contact Resistance=100mΩ, Insulation Resistance=100GΩ, LCSC Part Number=C221869, Manufacturer="C&K Components", Max Operating Temperature=60°C, Max Voltage Rating (DC)=12V, Min Operating Temperature=-20°C, Operating Force=1.96N, Supplier Part Number=CKN9085CT-ND, Actuator Material="Nylon, Polyamide", Category="Tactile Switches", ComponentLink1Description=https://datasheet.octopart.com:443/PTS645SH50SMTR92LFS-C%26K-Components-datasheet-169841344.pdf?src-supplier=Farnell, ComponentLink1URL=https://datasheet.octopart.com:443/PTS645SH50SMTR92LFS-C%26K-Components-datasheet-169841344.pdf?src-supplier=Farnell, ComponentLink2Description=https://datasheet.octopart.com:443/PTS645SH50SMTR92LFS-C%26K-Components-datasheet-165782998.pdf?src-supplier=Farnell, ComponentLink2URL=https://datasheet.octopart.com:443/PTS645SH50SMTR92LFS-C%26K-Components-datasheet-165782998.pdf?src-supplier=Farnell, ComponentLink3Description=https://datasheet.octopart.com:443/PTS645SH50SMTR92LFS-C%26K-Components-datasheet-67873720.pdf?src-supplier=Upverter, ComponentLink3URL=https://datasheet.octopart.com:443/PTS645SH50SMTR92LFS-C%26K-Components-datasheet-67873720.pdf?src-supplier=Upverter, ComponentLink4Description=https://datasheet.octopart.com:443/PTS645SH50SMTR92-LFS-C%26K-Components-datasheet-141421486.pdf?src-supplier=Upverter, ComponentLink4URL=https://datasheet.octopart.com:443/PTS645SH50SMTR92-LFS-C%26K-Components-datasheet-141421486.pdf?src-supplier=Upverter, ComponentLink5Description=https://datasheet.octopart.com:443/PTS645SH50SMTR92-LFS-C%26K-Components-datasheet-110647872.pdf?src-supplier=TME, ComponentLink5URL=https://datasheet.octopart.com:443/PTS645SH50SMTR92-LFS-C%26K-Components-datasheet-110647872.pdf?src-supplier=TME, ComponentLink6Description=https://datasheet.octopart.com:443/PTS645SH50SMTR-92-LFS-C%26K-Components-datasheet-150821959.pdf?src-supplier=TME, ComponentLink6URL=https://datasheet.octopart.com:443/PTS645SH50SMTR-92-LFS-C%26K-Components-datasheet-150821959.pdf?src-supplier=TME, ComponentLink7Description=https://datasheet.octopart.com:443/PTS645SH50SMTR92LFS-C%26K-Components-datasheet-138128951.pdf?src-supplier=Future+Electronics, ComponentLink7URL=https://datasheet.octopart.com:443/PTS645SH50SMTR92LFS-C%26K-Components-datasheet-138128951.pdf?src-supplier=Future+Electronics, ComponentLink8Description=https://datasheet.octopart.com:443/PTS645SH50SMTR92LFS-C%26K-Components-datasheet-62111174.pdf?src-supplier=Future+Electronics, ComponentLink8URL=https://datasheet.octopart.com:443/PTS645SH50SMTR92LFS-C%26K-Components-datasheet-62111174.pdf?src-supplier=Future+Electronics, ComponentLink9Description=https://datasheet.octopart.com:443/PTS645SH50SMTR92LFS-C%26K-Components-datasheet-24578962.pdf?src-supplier=Future+Electronics, ComponentLink9URL=https://datasheet.octopart.com:443/PTS645SH50SMTR92LFS-C%26K-Components-datasheet-24578962.pdf?src-supplier=Future+Electronics, ComponentLink10Description=https://datasheet.octopart.com:443/PTS645SH50SMTR92-LFS-C%26K-Components-datasheet-12590747.pdf?src-supplier=Future+Electronics, ComponentLink10URL=https://datasheet.octopart.com:443/PTS645SH50SMTR92-LFS-C%26K-Components-datasheet-12590747.pdf?src-supplier=Future+Electronics, Contact Material=Bronze, Contact Plating=Silver, Current Rating=50mA, Depth=9mm, Electrical Life=100kcycles, Height=3.4544mm, Illumination Type="Illuminated, Non-Illuminated", Lead Free="Lead Free", Length=6mm, Life (Cycles)=100kcycles, Lifecycle Status=Production, Manufacturer Part Number=PTS645SH50SMTR92LFS, Max Current Rating=50mA, Mechanical Life=100kcycles, Mounting Technology="Surface Mount", Number of Positions=1, Orientation=Straight, Packaging="Tape & Reel (TR)", Pricing="1=0.35, 10=0.3, 25=0.2804, 100=0.251, 250=0.23256, 500=0.21948, 1000=0.20725, 2000=0.19599, 3000=0.18986, 5000=0.18265, 7000=0.1782, 10000=0.17375, 25000=0.16349, 50000=0.15681 (USD)", REACH SVHC=Yes, RoHS=Compliant, Stock=7683, Supplier=DigiKey, Switch Function=Off-Mom, Termination="Gull Wing", Throw Configuration=SPST, Voltage Rating (DC)=12V
USB-C: "Connector", Manufacturer_Name="Same Sky", Datasheet Link=https://www.sameskydevices.com/product/resource/uj20-c-h-g-msmt-4b-p16-tr.pdf, Height=2.6mm, Manufacturer_Part_Number=UJ20-C-H-G-MSMT-4B-P16-TR
X1: library part FIT0587, "High Quality Gold Plated XT60 Male and amp, Female Bullet Connector", Manufacturer=DFRobot, Supplier Part Number=1738-1437-ND, Category=Uncategorized, Manufacturer Part Number=FIT0587, Pricing="1=1.5 (USD)", RoHS=Non-Compliant, Stock=5338, Supplier=DigiKey

## Via types
v1: diameter 23.62/23.62 (per signal layer), hole 11.81, Top Layer to Bottom Layer, tented both sides, 94 vias

## Nets (pads, with @x,y where several pads share a name; then routed paths per layer and width w, separated by ;. In a path a pad name is that pad's centre, name@x,y a point inside that pad or via, vN(x,y) a via of type N, cw(c..) or ccw(c..) an arc to the next point about the centre after c; other vN are vias at no path point)
+3v3: 3V3.1 C1.2 C2.2 C11.1 C12.2 IC1.2 IC2.3 IC2.6 IC3.5 IC4.5 PS1.3 Q1.2 R1.2 R16.2 | length 5294.1
  Top Layer w10: IC2.3 IC2.6
  Top Layer w15: 3V3.1@970,220 1090,220 1220,220 1581,220 1680,319 v1(1680,391) 1678.04,391 1654.76,367.72 C1.2 C2.2 1394.96,492.76 1343.86,492.76 IC1.2 ; IC2.6 1712.8,1735.8 v1(1744,1767) 1770,1793 1922.21,1793 1959.21,1756 IC4.5 ; v1(2116,1553) 2116,1548.8 2147.4,1517.4 IC3.5 2233.29,1517.4 2328.17,1612.28 2328.17,1633.09 2332.48,1637.4 Q1.2 Q1.2@2354.13,1637.4 ; R1.2 2322,1400 v1(2358,1364) ; PS1.3 2367.04,760.37 2243.92,760.37 C11.1 2242.5,761.78 2190.5,761.78 C12.2 2152.28,762.28 v1(2130,740) 2170,700 2540.2,700 2573.04,667.16 2588.24,667.16 2621.08,634.31 2624.04,634.31 R16.2
  Bottom Layer w15: v1(1680,391) 1781,391 2358,968 v1(2358,1364) 2170.65,1551.35 2117.65,1551.35 v1(2116,1553) 1998.62,1553 1948.62,1503 1788,1503 1744,1547 v1(1744,1767)
+5V: 5V.1 C8.2 C10.2 D5.2 IC2.7 J1.1 J15.1 J17.1 PS1.1 R10.2 USB-C.A4 USB-C.B4 USB-C.B5 | length 2933.1
  Top Layer w10: 5V.1 J1.1 1654.57,1638 1685.47,1668.9 1685.47,1695.04 IC2.7 1688.94,1698.5 1688.94,1785.94 1735,1832 2251.26,1832 2448.5,1634.76 R10.2 2448.5,1474.59 2523.92,1399.17 2548.09,1399.17 USB-C.B4 ; C10.2 2305.95,1028 2343.19,1028 ; PS1.1 2356.89,940.55 2343.19,954.25 2343.19,1028 ; USB-C.B5 2603.55,1368.9 2629.14,1394.49 2705.51,1394.49 2720,1380 2720,1200 2700,1180 2625.62,1180 2600.11,1205.51 USB-C.A4 2551.17,1207.11 2472.6,1207.11 C8.2 2466.97,1204.69 2371.89,1204.69 D5.2 2368.11,1200.91 2353.79,1200.91 2343.19,1190.31 2343.19,1028
BTN_GPIO0: C7.2 R2.1 SW1.1 SW1.2 | length 485.3
  Top Layer w15: R2.1 1970,224.31 1983.01,237.32 1983.01,265.3 C7.2 1987.72,320.55 2008.58,341.42 SW1.2 SW1.1
CHIP_PU: C13.2 IC1.3 R16.1 SW2.1 SW2.2 | length 2014.9
  Top Layer w15: IC1.3 1473.82,551.18 1525,500 1790,500 1850,440 2400,440 2498.58,341.42 SW2.2 ; C13.2 2493.7,331.61 SW2.2 ; R16.1 2671.65,481.34 2811.57,341.42 SW2.1 SW2.2
CON2_USB_N: D4.2 R5.1 USB-C.A7 USB-C.B7 | length 873.9
  Top Layer w10: R5.1 2127.26,1261.73 2127.26,1270.35 2133.12,1276.21 2154.54,1276.21 2160.05,1281.71 2168.33,1281.71 2174.19,1275.85 2174.19,1267.69 2176.08,1265.8 D4.2 2184.75,1265.8 2186.64,1267.69 2186.64,1277.14 2192.5,1283 2444.72,1283 2472.04,1310.33 2649.67,1310.33 v1(2665,1295) ; USB-C.B7@2552.77,1269.99 2607.01,1269.99 2662,1215 v1(2680,1215)
  Bottom Layer w10: v1(2665,1295) 2645,1275 2645,1230 2657.39,1217.61 2677.39,1217.61 v1(2680,1215)
CON2_USB_P: D3.2 R7.1 USB-C.A6 USB-C.B6 | length 870.2
  Top Layer w10: R7.1 2126.26,1310.27 2126.26,1302.07 2132.12,1296.21 2146.26,1296.21 2151.76,1301.71 2170.21,1301.71 2177.36,1308.86 2177.36,1318.31 2179.25,1320.2 D3.2 2186.75,1320.2 2188.64,1318.31 2188.64,1308.86 2194.5,1303 2436.43,1303 2463.76,1330.33 2650,1330.33 2664.67,1345 v1(2665,1345) ; USB-C.A6 2621.16,1290.16 2653.71,1257.61 2677.39,1257.61 v1(2680,1255)
  Bottom Layer w10: v1(2665,1345) 2705,1305 2705,1280 v1(2680,1255)
CON2_USB_R_N: IC1.13 R5.2 | length 826.1
  Top Layer w15: IC1.13 1345.65,1061.4 1363.96,1061.4 1366.25,1063.68 1539.72,1063.68 1749.54,1273.5 2038.45,1273.5 2047.24,1264.71 2047.24,1259.23 R5.2
CON2_USB_R_P: IC1.14 R7.2 | length 825.1
  Top Layer w15: IC1.14 1345.65,1090.96 1363.96,1090.96 1366.25,1088.68 1529.36,1088.68 1739.18,1298.5 2037.45,1298.5 2046.24,1307.29 2046.24,1312.77 R7.2
DATA: DATA.1 IC2.8 J41.1 J42.1 J43.1 J44.1 J45.1 J46.1 | length 3136.5
  Top Layer w10: J44.1 418.43,1900 752.83,1900 J45.1 904.02,1900 1252.83,1900 J46.1 1404.02,1900 1752.83,1900 ; IC2.8 1661.61,1808.78 1752.83,1900 ; 2778.43,1928.43 2750,1900 2378.43,1900 J42.1 2243.43,1925 1879.02,1925 J41.1 1752.83,1900 ; J43.1 2778.43,1786.57 DATA.1
DATA_ESP: DATA_E.1 IC2.5 IC4.2 | length 312.9
  Top Layer w10: IC4.2 1858.81,1591.98 1828.02,1591.98 1742.24,1677.76 1742.24,1692.91 IC2.5 1739.2,1696.77 1742.24,1699.81 1831.81,1699.81 DATA_E.1
GND: C3.2 C4.2 C5.2 C6.2 C9.2 D1.2 D2.2 GND.1 IC5.5 J38.1 J40.1 J41.3 J42.3 J43.3 J44.3 J45.3 J46.3 R14.1 R15.1 R17.2 X1.N | length 5521.5
  Top Layer w10: v1(1250,2970) 1293.02,3013.02 C9.2 1338.34,3024.35 1385.53,3024.35 1404.17,3042.99 R14.1 ; R15.1 1439,3421 v1(1460,3400) 1480,3400 1520,3360 IC5.5@1520,3330
  Top Layer w15: X1.N 171,3067.48 349.53,2888.95 R17.2 350,2885.53 350,2825 325,2800 J40.1 J38.1 175,2707 GND.1
  Top Layer w75: X1.N 201.85,3129.12 338.12,3129.12 355,3146 735,3146 902.74,3313.74 ; v1@2080,3540 2120,3500 D1.2
  Bottom Layer w40: 151.57,2471.57 160,2480 ; 631.57,2451.57 640,2460 ; 1120,2440 1131.57,2428.43 ; 1631.57,2389.27 1659.6,2417.29 ; 1678.15,2403.43 1678.15,2485
  Bottom Layer w100: J44.3 151.57,2471.57 ; J45.3 631.57,2451.57 ; J46.3 1131.57,2428.43 ; J41.3 1631.57,2389.27 ; 1678.15,2403.43 J42.3 ; 2460,2680 2581.57,2558.43 J43.3
  other v1: 360,3120 400,3120 440,3120 480,3120 690,3120 750,3130 360,3170 400,3170 440,3170 480,3170 690,3170 790,3170 730,3180 820,3200 760,3210 850,3230 790,3240 880,3260 820,3270 850,3300 2097.44,3487.95 2117.44,3507.95 2080,3510 2060,3530 2100,3530 2080,3550
GND_ESP: C1.1 C2.1 C7.1 C8.1 C10.1 C11.2 C12.1 C13.1 D3.1 D4.1 D5.1 IC1.1 IC1.40 IC1.41 IC1.42 IC1.43 IC1.44 IC1.45 IC1.46 IC1.47 IC1.48 IC1.49 IC2.2 IC3.3 IC4.3 PS1.2 PS1.4 R6.1 R10.1 R12.2 R17.1 SW1.3 SW1.4 SW2.3 SW2.4 USB-C.A1 USB-C.B1 USB-C.MH1 USB-C.MH2 USB-C.MH3 USB-C.MH4 | length 7979.3
  Top Layer w10: R10.1 2512.95,1521.46 USB-C.MH2
  Top Layer w15: 87,240.57 97.57,230 591,230 646.46,285.46 IC1.40 ; v1@918,743 v1(918,744) 918,745 928.12,755.12 IC1.47 ; v1(938,844) 961.12,844 IC1.46 ; v1(952,643) 952,657.12 IC1.48 IC1.49 ; v1(1021,611) 1050,640 IC1.49 ; v1(1050,863) IC1.45 ; v1(1145,847) 1141.88,847 IC1.44 IC1.45 ; v1(1166,760) 1161.12,755.12 IC1.43 ; v1(1556,276) 1557.65,277.65 1557.65,292.65 1597.28,332.28 ; C1.1 1597.28,332.28 ; v1(1665,1473) 1687.2,1495.2 IC2.2 ; IC4.3 1865.1,1556.91 1890.91,1556.91 v1(1909,1575) ; v1(1879,316) 1925,270 C7.1 ; v1(1973,1412) 2003.6,1442.6 IC3.3 2065.1,1438.29 2086.81,1438.29 2179.3,1345.8 D3.1 ; SW1.4 2013.5,561.5 v1(2064,612) ; v1(2108,838) 2148.28,797.72 C12.1 2190.5,797.22 2242.5,797.22 C11.2 2296.28,850 PS1.2 ; R6.1 2160,1710 v1(2191,1679) ; v1(2175,1087) 2158.5,1103.5 R12.2 2158.5,1221.41 2177.3,1240.2 D4.1 ; v1(2177,998) 2204,1025 C10.1 ; v1(2269,612) 2295,612 2326.5,580.5 SW1.3 ; v1(2385,223) 2412,250 C13.1 ; v1(2394,1119) 2370,1143 D5.1 2370.61,1176.59 2468.42,1176.59 C8.1@2471.37,1173.65 ; v1(2461,613) 2503.5,570.5 SW2.4 ; C8.1@2471.73,1174.02 USB-C.A1 2563.6,1174.02 2567.91,1169.7 2567.91,1158.88 2584.73,1142.06 2584.73,1092.85 USB-C.MH1 ; USB-C.B1 2563.6,1425.98 2567.91,1430.3 2567.91,1441.12 2584.73,1457.94 2584.73,1507.15 USB-C.MH2 ; v1(2792,609) 2816.5,584.5 SW2.3 ; IC1.47 IC1.46 ; IC1.47 IC1.41 IC1.43 ; IC1.46 IC1.45 ; IC1.49 IC1.42 ; IC1.42 1105.12,594.88 1248.82,451.18 IC1.1 1347.24,451.18 1466.14,332.28 C2.1 1597.28,332.28 ; IC1.42 IC1.43
  Top Layer w30: v1(109,138) 87,160 87,240.57 87,2810 163,2886 R17.1
  Top Layer w100: 2773.16,863.84 2773.33,864
  Top Layer w200: PS1.4@2607.05,863.84 2665.66,863.84 2760,863.84 2773.16,863.84 ; 2773,864 2773.33,864
  Bottom Layer w100: 2670,1003 2678,995 2678,950 ; 2678,696 2678,770 v1@2678,800
  other v1: 1105,621 2665.66,761.81 2700,770 2730,770 2760,770 2790,770 2670,800 2700,800 2730,800 2760,800 2790,800 2670,840 2700,840 2730,840 2760,840 2790,840 2670,880 2700,880 2730,880 2760,880 2790,880 2670,920 2700,920 2730,920 2760,920 2790,920 2700,950 2730,950 2760,950 2790,950
GPIO1: D01.1 IC1.39 | length 602.8
  Top Layer w15: D01.1 650,180 719,249 719,485 709.99,494.01 702.82,501.18 IC1.39
GPIO2: D02.1 IC1.38 | length 361.3
  Top Layer w15: D02.1 599.43,419.43 599.43,526.15 614.25,540.96 636.24,540.96 IC1.38
GPIO3: D03.1 IC1.15 | length 303.2
  Top Layer w15: IC1.15 1265.94,1162.2 1306,1202.26 D03.1
GPIO4: D04.1 IC1.4 | length 140.1
  Top Layer w15: IC1.4 1473.82,601.18 D04.1
GPIO5: D05.1 IC1.5 | length 417.8
  Top Layer w15: IC1.5 1502.55,651.18 1558.73,595 D05.1
GPIO6: D06.1 IC1.6 | length 397.1
  Top Layer w15: IC1.6 1723.82,701.18 D06.1
GPIO7: D07.1 IC1.7 | length 659.1
  Top Layer w15: IC1.7 1336.61,750 1800,750 1840,710 1840,656 D07.1
GPIO8: D08.1 IC1.12 | length 256.5
  Top Layer w10: IC1.12 1551.18,1001.18 D08.1
GPIO9: D09.1 IC1.17 | length 311.4
  Top Layer w15: D09.1 1106,1294 1165.94,1234.06 IC1.17
GPIO10: D10.1 IC1.18 | length 332.1
  Top Layer w15: D10.1 1006,1334 1115.94,1224.06 IC1.18
GPIO11: D11.1 IC1.19 | length 352.9
  Top Layer w15: D11.1 906,1364 1065.94,1204.06 IC1.19
GPIO12: D12.1 IC1.20 | length 373.6
  Top Layer w15: D12.1 806,1389.89 1005.73,1190.17 1005.73,1160.61 IC1.20
GPIO13: D13.1 IC1.21 | length 443.2
  Top Layer w15: D13.1 706,1348.79 714.79,1340 798.33,1340 955.73,1182.6 955.73,1160.61 IC1.21
GPIO14: D14.1 IC1.22 | length 469.1
  Top Layer w15: D14.1 606,1389.89 690.89,1305 783.33,1305 905.73,1182.6 905.73,1160.61 IC1.22
GPIO15: D15.1 IC1.8 | length 606.7
  Top Layer w15: IC1.8 1794.82,801.18 D15.1
GPIO18: D18.1 IC1.11 | length 433.1
  Top Layer w10: IC1.11 1651.18,951.18 1707.28,1007.28 1707.28,1027.28 D18.1
GPIO21: D21.1 IC1.23 | length 494
  Top Layer w15: D21.1 663,1280 762.51,1280 855.73,1186.79 855.73,1160.61 IC1.23
GPIO35: D35.1 IC1.28 | length 198.4
  Top Layer w15: D35.1 541.47,1080 570.29,1051.18 IC1.28
GPIO36: D36.1 IC1.29 | length 195.2
  Top Layer w15: D36.1 545.29,980 566.47,1001.18 IC1.29
GPIO37: D37.1 IC1.30 | length 215.9
  Top Layer w15: D37.1 520.29,880 591.47,951.18 IC1.30
GPIO38: D38.1 IC1.31 | length 236.7
  Top Layer w15: D38.1 475.02,795.02 496.02,795.02 591.96,890.96 636.24,890.96 IC1.31
GPIO39: D39.1 IC1.32 | length 273.2
  Top Layer w15: D39.1 477.11,697.11 477.11,723.14 502.11,748.14 502.11,749.11 603.22,850.22 645.49,850.22 IC1.32
GPIO40: D40.1 IC1.33 | length 320.2
  Top Layer w15: D40.1 543.39,663.39 543.39,735.25 603.36,795.22 640.49,795.22 IC1.33
GPIO41: D44.1 IC1.34 | length 361.3
  Top Layer w15: D44.1 568.39,588.39 568.39,695.11 614.25,740.96 636.24,740.96 IC1.34
GPIO42: D42.1 IC1.35 | length 411.3
  Top Layer w15: D42.1 547,467 547,509.07 593.39,555.47 593.39,670.11 614.25,690.96 636.24,690.96 IC1.35
GPIO45: D45.1 IC1.26 | length 628.7
  Top Layer w15: D45.1 492.61,1150.39 IC1.26
GPIO46: D46.1 IC1.16 | length 290.7
  Top Layer w15: D46.1 1215.94,1427.06 IC1.16
GPIO47: D47.1 IC1.24 | length 552.6
  Top Layer w15: D47.1 593,1250 757.16,1250 813.52,1193.63 813.52,1152.81 IC1.24
GPIO48: D48.1 IC1.25 | length 601.9
  Top Layer w15: D48.1 533,1210 745.97,1210 762.34,1193.63 762.34,1154 IC1.25
NetC6_1: C6.1 D2.1 IC5.2 R8.2 R9.2 R11.2 X1.P | length 1827.9
  Top Layer w10: R9.2 1351.26,3398.74 1449.97,3300.03 1573.61,3300.03 1579.46,3305.89 1579.46,3350.39 IC5.2 1580.69,3386.09 1581.31,3386.72 1581.31,3447.31 1667.4,3533.4 R11.2
  Top Layer w75: X1.P 515.87,3381.73 580,3317.6 D2.1 759.61,3316.61 841.74,3398.74 904,3398.74 R8.2 R9.2
NetC9_1: C9.1 IC5.6 | length 233.6
  Top Layer w10: C9.1 1379.98,3064.98 1445,3130 1490,3175 1515,3175
NetIC1_27: IC1.27 R2.2 | length 2247.5
  Top Layer w15: IC1.27 716.82,1101.18 744.48,1073.52 744.48,158.52 778,125 1858.74,125 1923.74,190 R2.2
NetIC3_4: IC3.4 R1.1 | length 106.8
  Top Layer w10: IC3.4 2171.02,1442.6 2213.62,1400 R1.1
NetIC5_1: IC5.1 Q2.2 R8.1 R9.1 | length 1522.9
  Top Layer w10: R9.1 1320.39,3170.39 1430,3280 1587.72,3280 1601.59,3293.87 1601.59,3324
  Top Layer w75: Q2.2 749.49,2615 965,2615 ; Q2.2@744.49,2665 744.49,2925.49 989.39,3170.39 R8.1 R9.1
NetIC5_3: IC5.3 R11.1 R13.2 | length 335.8
  Top Layer w10: R13.2 1508.53,3584 R11.1 1592.6,3532.6 1561.31,3501.31 IC5.3@1561.31,3351.61
NetIC5_4: IC5.4 R13.1 R15.2 | length 258.8
  Top Layer w10: R15.2 1502.82,3530.65 R13.1 1504,3501 1541.31,3463.69 IC5.4
NetIC5_7: IC5.7 R14.2 | length 154.1
  Top Layer w10: R14.2 1487.01,3077.01 1539.38,3129.38 IC5.7@1539.38,3178.39
NetIC5_10: IC5.10 Q2.1 | length 1207.3
  Top Layer w10: Q2.1 1095.47,2520 1026,2589.47 1026,2918 1193,3085 1272.53,3085 1418.67,3231.14 1595.73,3231.14 1601.59,3225.28 1601.59,3212.16 1601.59,3207
NetJ47_A5: R12.1 USB-C.A5 | length 379
  Top Layer w10: R12.1 2221.5,1161.97 2233.23,1173.7 2294.21,1173.7 2371.3,1250.79 2430.93,1250.79 2441.72,1240 2458.28,1240 2469.07,1250.79 USB-C.A5
NetQ1_1: Q1.1 R3.2 | length 73.6
  Top Layer w10: Q1.1 2353.19,1562.6 2360,1555.79 R3.2
NetR4_1: R4.1 R6.2 | length 83.3
  Top Layer w10: R6.2 2076.81,1710 2070,1703.19 2070,1678.7 2087.75,1660.95 2087.75,1643.91 R4.1
PGOOD: IC5.8 PG.1 | length 279
  Top Layer w10: PG.1 1561,3045 IC5.8
RX_ESP: IC1.9 IC4.4 RX_E.1 | length 2380.9
  Top Layer w10: IC1.9 1781.18,851.18 v1(1855,925) 1925,925 RX_E.1 ; v1(1446.85,1312.99) 1469.65,1290.19 1487.72,1290.19 1507.92,1270 1623,1270 1853,1500 1894.8,1500 1947.4,1552.6 IC4.4
  Bottom Layer w10: v1(1446.85,1312.99) 1410,1276.14 1410,855.86 1415.86,850 1780,850 v1(1855,925)
ST_PWR: C3.1 C4.1 C5.1 D1.1 IC5.9 J41.2 J42.2 J43.2 J44.2 J45.2 J46.2 PWR.1 Q2.3 | length 6031.5
  Top Layer w10: J44.2 320,2040 665.59,2040 J45.2 794.41,2040 1165.59,2040 J46.2 1294.41,2040 1665.59,2040 J41.2 ; IC5.9@1581,3178.39 1581,3122 1588.83,3114.17 D1.1@2102.28,3114.17 ; 1656.85,2720 C3.1 ; D1.1 D1.1@2102.28,3114.17 ; PWR.1 2680,2170 J43.2 2615.59,2040 2260,2040 J42.2 2140,2040 1794.41,2040 J41.2 ; J41.2 1730,2310 C4.1 1971,2450 C5.1 2143,2762 2034.85,2762 C3.1 ; C3.1 1918.11,2930 D1.1@2102.28,3114.17
  Top Layer w40: Q2.3 1656.85,2720
TX_EN: IC3.1 IC4.1 Q1.3 R4.2 | length 572.4
  Top Layer w10: IC4.1 1902.57,1627.4 1929.38,1600.59 2005.98,1600.59 2045.39,1640 R4.2 2048.35,1524.21 2055.16,1517.4 IC3.1 ; R4.2@2051.3,1640 2058.11,1633.19 2058.11,1625.76 2083.87,1600 Q1.3
TX_ESP: IC1.10 IC3.2 R3.1 TX_E.1 | length 2341.4
  Top Layer w10: IC1.10 1746.18,901.18 v1(1800,955) 1802.61,957.61 1802.61,962.61 TX_E.1 ; v1(1488.96,1251.04) 1490,1250 1637,1250 1867,1480 IC3.2 2210.35,1480 2232.01,1458.35 R3.1
  Bottom Layer w10: v1(1488.96,1251.04) 1432.92,1195 1432.92,905.86 1438.77,900 1745,900 v1(1800,955)
pads on no net: IC1.36 IC1.37 IC2.1 IC2.4 USB-C.A8 USB-C.B8

## Polygon pours and split planes (outlines as drawn)
GND_ESP on Bottom Layer "NONET_L02_P-001" (solid, remove dead copper, pour order 8): 0,1850 0,50 2900,50 2900,1850
GND on Bottom Layer "NONET_L02_P-001" (solid, remove dead copper, pour order 2): 2921,1943.9 2921,3625 2125,3625 2125,1943.9
GND on Bottom Layer "NONET_L02_P-001" (solid, remove dead copper, pour order 1): 25,3550 25,1938.98 2175,1938.98 2175,3425 2175,3600 2150,3625 25,3625
GND_ESP on Top Layer "NONET_L02_P-001" (solid, remove dead copper, pour order 9): 2500,960 2500,750 2820,750 2840,750 2840,960
ST_PWR on Top Layer "NONET_L02_P-001" (solid, remove dead copper, pour order 7): 2890,2416.7 2890,1891.7 40,1891.7 40,2381.7 2850,2416.7 2880,2416.7
NetC6_1 on Top Layer "NONET_L02_P-001" (solid, remove dead copper, pour order 5): 25,3615 25,3235 735,3235 855,3355 1260,3355 1303,3355 1303,3605 25,3605 20,3610
ST_PWR on Top Layer "NONET_L02_P-001" (solid, remove dead copper, pour order 6): 1060.05,2888.38 1070.05,2898.38 1765.05,2898.38 1995.05,3128.38 1995.05,3228.38 2890.05,3228.38 2900.05,3238.38 2905.05,3233.38 2905.05,2773.38 2900.05,2778.38 2900.05,2658.38 2900.05,2293.38 1275.05,2293.38 1270.05,2298.38 1270.05,2898.38
NetIC5_1 on Top Layer "NONET_L02_P-001" (solid, remove dead copper, pour order 4): 1300,3095 1195,3095 1020,2920 1020,2320 995,2305 425,2305 425,2975 535,3085 830,3085 990,3245 1300,3245

## Keep-outs
Keep-Out Layer:
  lines w1: 2,1 2920,1 2920,3686 2,3686 2,1

## Silkscreen, mask and mechanical layers (free items; w line width, h text height)
Top Overlay:
  region: 4238 vertices and 0 holes, not listed, extent 2247.85,3007.17 2901.12,3633.11
Bottom Overlay:
  drawing of 43 lines, arcs and shapes, not listed
  text "I see my reflection in your eyes" at 2760,3040 h50 r13.63
  text "Need money for steamdeck :(" at 2810,86.66 h50